# Altium PCB ArmBand-Sensor-Board.PcbDoc
Units mil, origin at the board's own origin, x right, y up, seen from the top; angles counter-clockwise.
Board outline 1181.1 x 984.25 mil, 2 copper layers (Top Layer, Bottom Layer), stack 34 mil thick; 36 components, 29 nets, 139 pads, 82 vias.
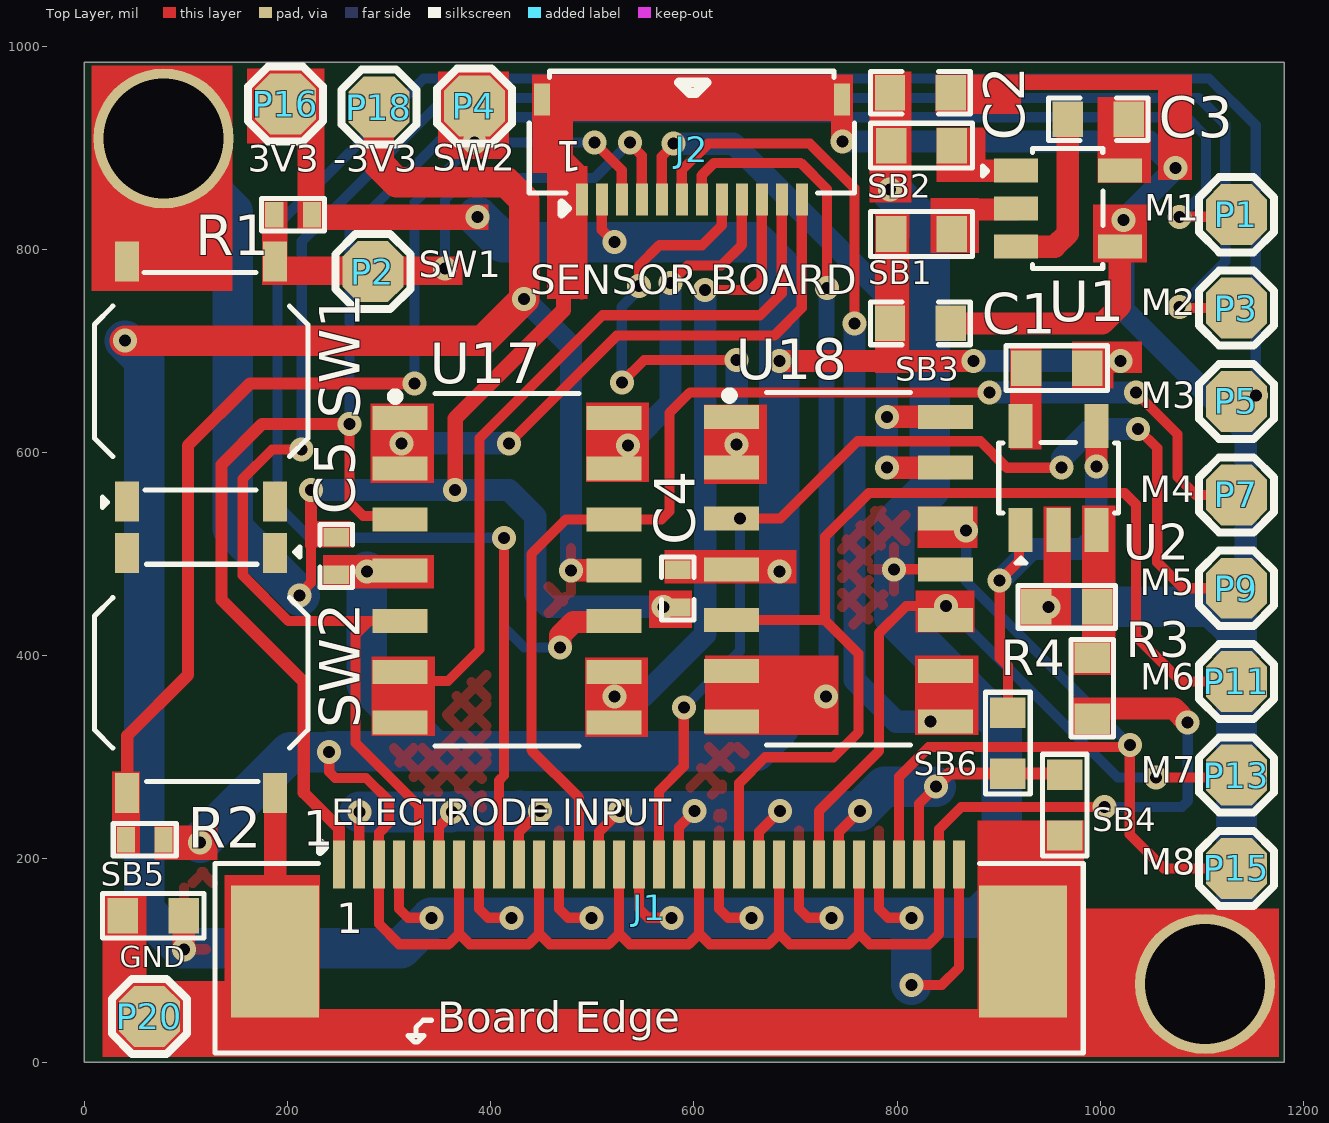
[diagram p0: Top Layer view]
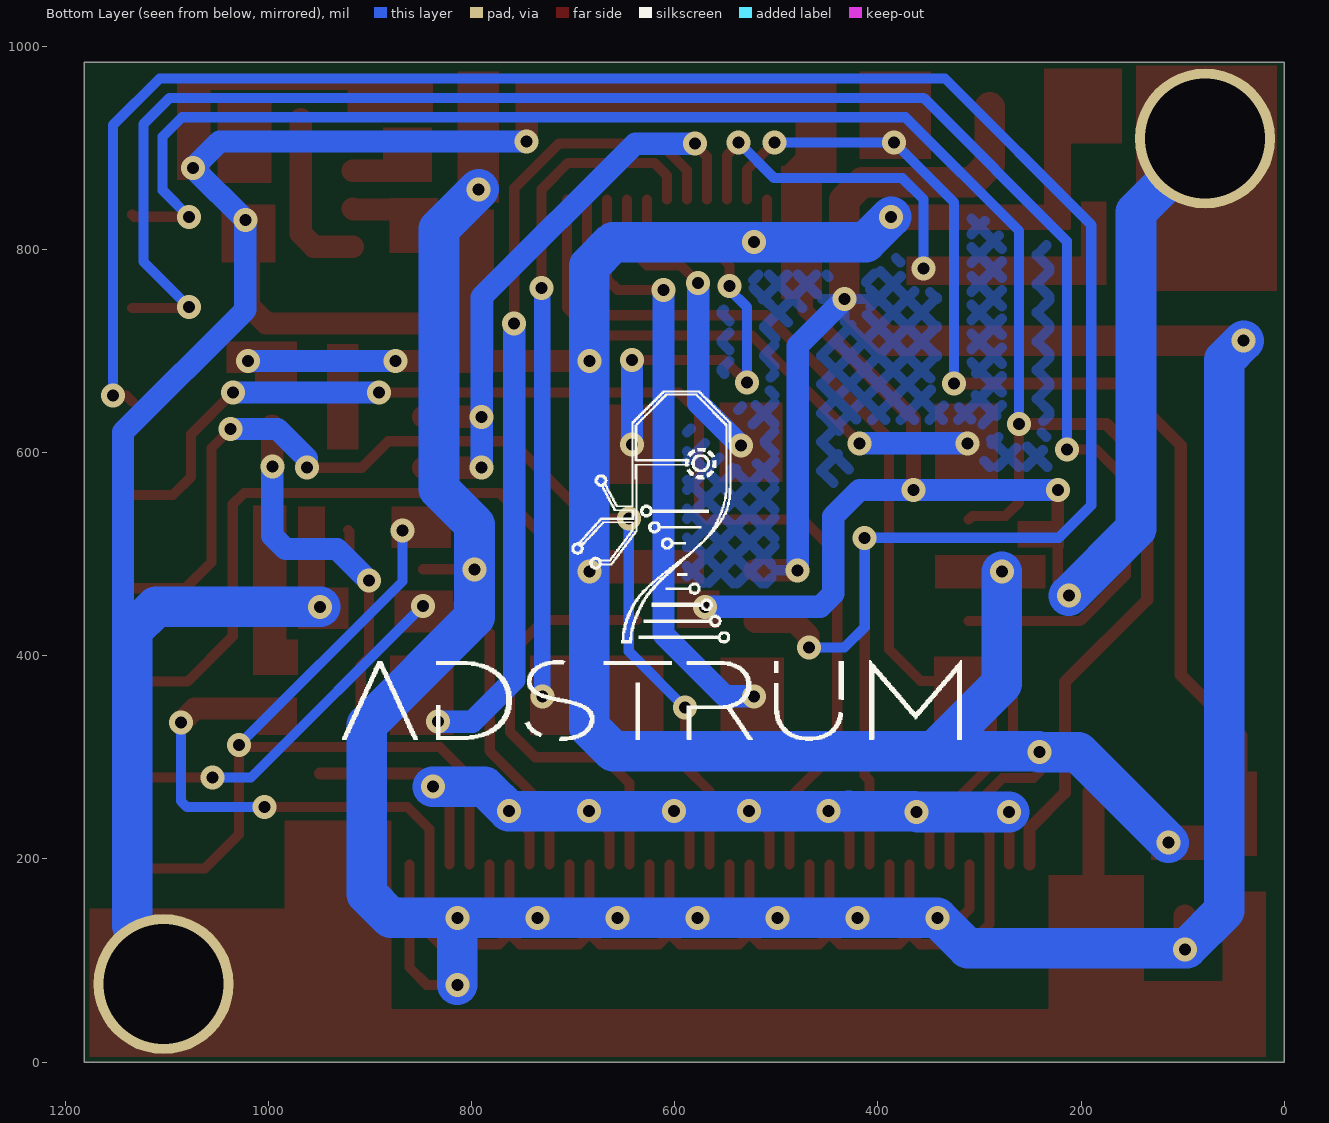
[diagram p1: Bottom Layer view, seen from below]
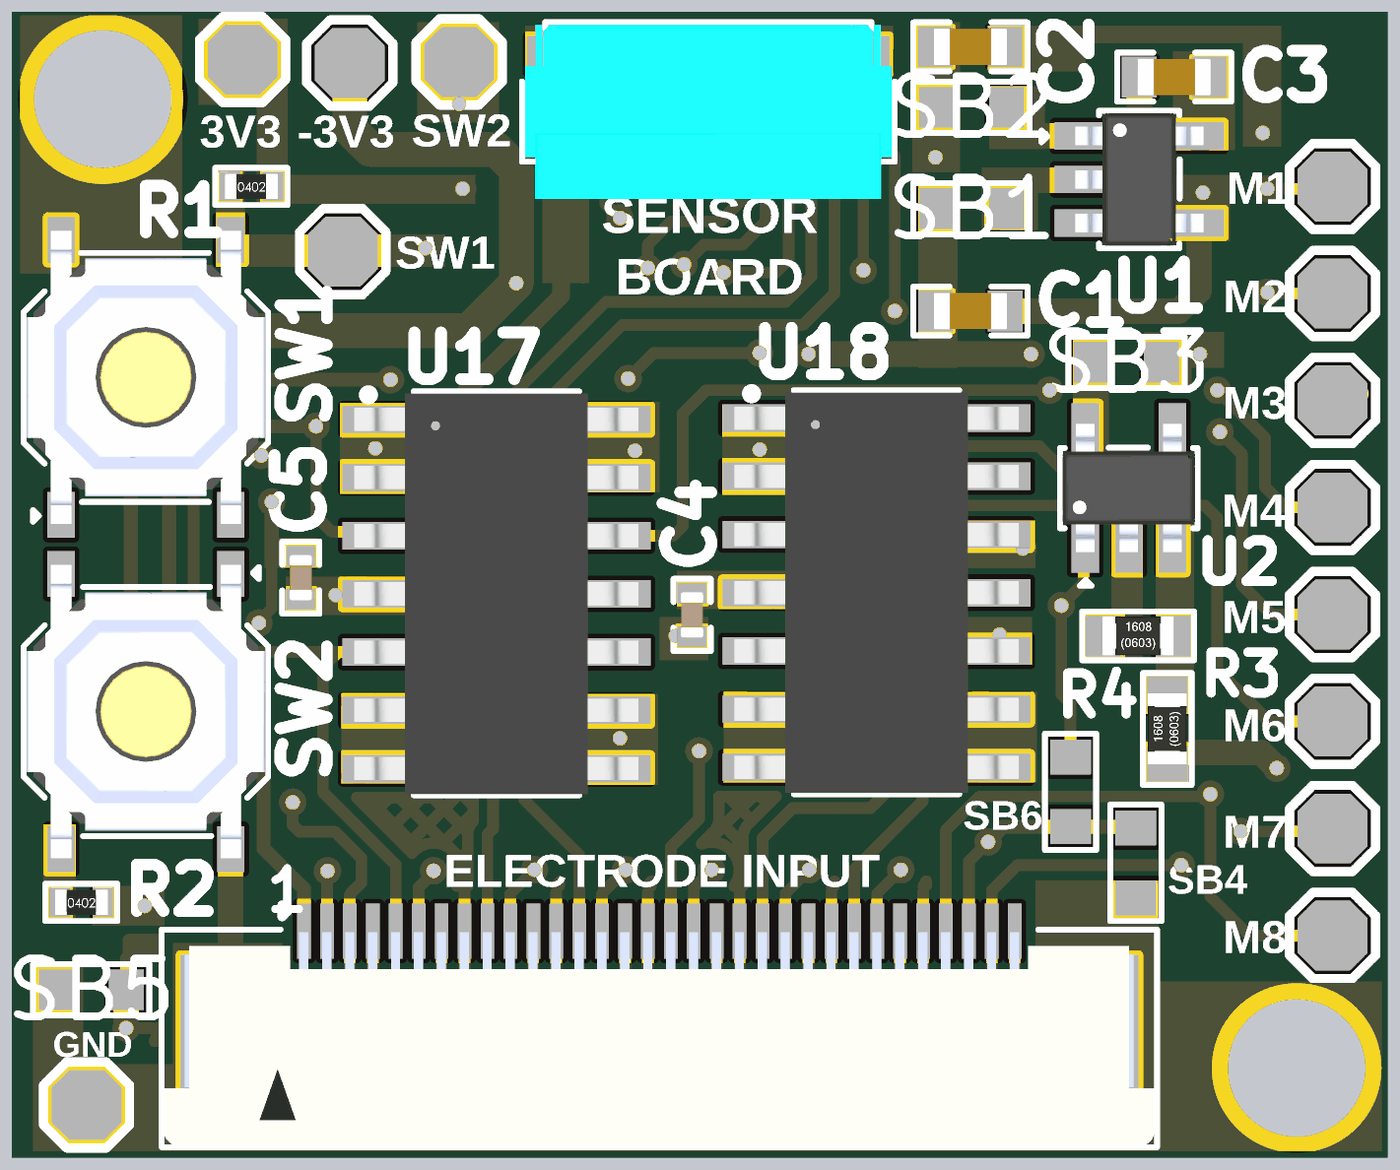
[diagram p2: 3D render of the assembled board from above, using the file's embedded part models]

## Layer stack, top to bottom
Top Solder: solder mask 3, Solder Resist, Dk 3.5
Top Layer: signal copper 9
Dielectric 1: dielectric 16, FR-4, Dk 4.8
Bottom Layer: signal copper 9
Bottom Solder: solder mask 3, Solder Resist, Dk 3.5

## Board outline
0,-0.25 1181.1,-0.25 1181.1,984 0,984

## Design rules (kind name [scope] priority, off if disabled: settings)
Clearance [All] p1: gap=7 ignorepadtopadclearanceinfootprint=FALSE except(0: Arc-Hole Track-Hole SMDPad-Hole THPad-Hole Via-Hole Fill-Hole Poly-Hole Region-Hole Text-Hole; 4: Arc-SMDPad Track-SMDPad SMDPad-SMDPad)
HoleSize [All] p1: absolutevalues=TRUE maxlimit=1000 minlimit=1 maxpercent=80.000 minpercent=20.000
HoleToHoleClearance [All] p1: gap=0 allowstackedmicrovias=TRUE
MinimumSolderMaskSliver [All] p1: minsoldermaskwidth=0
PolygonConnect [All] p1: connectstyle=Relief reliefconductorwidth=10 reliefentries=4 polygonreliefangle="90 Angle" airgapwidth=10
RoutingVias [All] p1: holewidth=11.81 width=23.62 viastyle="Through Hole" minholewidth=11.81 minwidth=23.62 maxholewidth=11.81 maxwidth=23.62
SilkToSilkClearance [All] p1: silktosilkclearance=0
SilkToSolderMaskClearance [IsPad] p1: minsilkscreentomaskgap=0 clearancetoexposedcopper=TRUE
SolderMaskExpansion [All] p1: expansion=4 istentingtop=FALSE
Width [All] p1: maxlimit=40 minlimit=10 preferedwidth=22
25 further rules are at their usual default settings.

## Classes and differential pairs
component class U_Opamp-Sheet2: C1 C2 C3 C4 C5 R3 R4 SB1 SB2 SB3 U1 U2 U17 U18
component class U_Connector-Sheet: J1 J2 P1 P2 P3 P4 P5 P7 P9 P11 P13 P15 P16 P18 P20 R1 R2 SB4 SB5 SB6 SW1 SW2

## Components (designator, comment, footprint, x,y, rotation, side; value= is the part's Value field where it differs from the comment)
C1 "10uF" Cap-0603 823,727 r0 top locked
C2 "10uF" Cap-0603 823,954 r0 top locked
C3 "10uF" Cap-0603 998,928 r180 top
C4 "0.1uF" Cap-0402 584,466 r270 top locked
C5 "0.1uF" Cap-0402 248,498 r90 top locked
J1 "AFC07-S32FCA-00" AFC07-S32FCA-00_ 555.89,151.72 r0 top locked
J2 "FH34SRJ-12S-0.5SH(50)" FH34SRJ-12S-0.5SH(50)_ 597.9,898.21 r180 top locked
P1 "Test Point" "TEST POINT" 1134,834 r0 top locked
P2 "TEST POINT" Test-point 284,778 r0 top locked
P3 "Test Point" "TEST POINT" 1134,742.09 r0 top locked
P4 "TEST POINT" Test-point 384,941 r0 top locked
P5 "Test Point" "TEST POINT" 1134,650.17 r0 top locked
P7 "Test Point" "TEST POINT" 1134,558.26 r0 top locked
P9 "Test Point" "TEST POINT" 1134,466.34 r0 top locked
P11 "Test Point" "TEST POINT" 1134,374.43 r0 top locked
P13 "Test Point" "TEST POINT" 1134,282.51 r0 top locked
P15 "Test Point" "TEST POINT" 1134,190.6 r0 top locked
P16 "Test Point" "TEST POINT" 198,943 r90 top locked
P18 "Test Point" "TEST POINT" 290,940 r180 top locked
P20 "Test Point" "TEST POINT" 64,45 r0 top locked
R1 "10K" Res-0402 205.5,834 r0 top locked
R2 "10K" Res-0402 59.5,219 r0 top locked
R3 "64K" Res-0603 992,368 r270 top
R4 "64K" Res-0603 967,448 r180 top
SB1 "Solder Bridge" "Solder Bridge" 824,815 r0 top locked
SB2 "Solder Bridge" "Solder Bridge" 824,902 r180 top locked
SB3 "Solder Bridge" "Solder Bridge" 957,683 r180 top
SB4 "Solder Bridge" "Solder Bridge" 965,253 r270 top locked
SB5 "Solder Bridge" "Solder Bridge" 68,144 r180 top locked
SB6 "Solder Bridge" "Solder Bridge" 909,314 r270 top
SW1 "TC-0522C-1.7-260G" TC-0522C-1.7-260G_ 115,670 r90 top locked value=-
SW2 "TC-0522C-1.7-260G" TC-0522C-1.7-260G_ 115,383 r270 top locked value=-
U1 "SGM3207YN5G/TR" SOT-23-5 968,840 r0 top locked
U2 "TPMCP6021T-E/OT" SOT-23-5 959,575 r90 top
U17 "LM324DT" SO-14 416,484 r0 top locked
U18 "LM324DT" SO-14 742.31,485 r0 top locked

## Footprints (in the part's own frame and the unit in brackets; to place one, negate y for a bottom-side part, rotate by r counter-clockwise, add the part's x,y. Pads: shape width x height; smd on the part's side, far side on the other; paste and mask are expansions set on the pad)
AFC07-S32FCA-00_ [mm]
  rect 0.3x1.2 smd: 1(-7.75,1.085) 2(-7.25,1.085) 3(-6.75,1.085) 4(-6.25,1.085) 5(-5.75,1.085) 6(-5.25,1.085) 7(-4.75,1.085) 8(-4.25,1.085) 9(-3.75,1.085) 10(-3.25,1.085) 11(-2.75,1.085) 12(-2.25,1.085) 13(-1.75,1.085) 14(-1.25,1.085) 15(-0.75,1.085) 16(-0.25,1.085) 17(0.25,1.085) 18(0.75,1.085) 19(1.25,1.085) 20(1.75,1.085) 21(2.25,1.085) 22(2.75,1.085) 23(3.25,1.085) 24(3.75,1.085) 25(4.25,1.085) 26(4.75,1.085) 27(5.25,1.085) 28(5.75,1.085) 29(6.25,1.085) 30(6.75,1.085) 31(7.25,1.085) 32(7.75,1.085)
  rect 2.2x3.3 smd: MP1(9.35,-1.085) MP2(-9.35,-1.085)
  silkscreen extent -10.85,-3.63 10.85,1.65, body extent -10.8,-3.59 10.79,1.05, height 2.02
Cap-0402 [mil]
  rect 18x25 smd mask+2.36: 1(-18.5,0) 2(18.5,0)
  silkscreen extent -31,-16 31,16, body extent -20,-10 20,10, height 19
Cap-0603 [mil]
  rect 30x35 smd mask+2.36: 1(-30,0) 2(30,0)
  silkscreen extent -49,-21 49,21, body extent -32,-16 31,16, height 34
FH34SRJ-12S-0.5SH(50)_ [mm]
  rect 0.3x0.8 smd: 1(2.75,1.25) 2(2.25,1.25) 3(1.75,1.25) 4(1.25,1.25) 5(0.75,1.25) 6(0.25,1.25) 7(-0.25,1.25) 8(-0.75,1.25) 9(-1.25,1.25) 10(-1.75,1.25) 11(-2.25,1.25) 12(-2.75,1.25)
  rect 0.4x0.8 smd: MP1(-3.75,-1.25) MP2(3.75,-1.25)
  silkscreen extent -4.06,-1.96 4.06,1.63, body extent -4,-1.9 4,1.9, height 1
Res-0402 [mil]
  rect 18x25 smd mask+2.17: 1(-18.5,0) 2(18.5,0)
  silkscreen extent -32,-17 32,16, body extent -23,-11 23,11, height 16
Res-0603 [mil]
  rect 30x35 smd: 1(-30,0) 2(30,0)
  silkscreen extent -48,-21 48,21, body extent -31,-17 31,17, height 18
SO-14 [mm] "0.4 V/us 4 1.3MHz 3V ~ 32V, ±1.5V ~ 16V 1.5mA General Purpose SOIC-14_150mil Operational Amplifier ROHS"
  rect 1.37x0.6 smd: 1(-2.675,3.81) 2(-2.675,2.54) 3(-2.675,1.27) 4(-2.675,0) 5(-2.675,-1.27) 6(-2.675,-2.54) 7(-2.675,-3.81) 8(2.675,-3.81) 9(2.675,-2.54) 10(2.675,-1.27) 11(2.675,0) 12(2.675,1.27) 13(2.675,2.54) 14(2.675,3.81)
  silkscreen extent -2.87,-4.39 1.8,4.42, body extent -3.1,-4.37 3.1,4.37, height 1.76
"Solder Bridge" [mil] "Solder Bridge ON"
  rect 30x35 smd: 1(-30,0) 2(30,0)
  silkscreen extent -50,-22 50,22
SOT-23-5 [mm]
  rect 1.1x0.6 smd: 1(-1.3,0.95) 2(-1.3,0) 3(-1.3,-0.95) 4(1.3,-0.95) 5(1.3,0.95)
  silkscreen extent -2.13,-1.5 0.88,1.5, body extent -1.4,-1.45 1.4,1.45, height 1.45
TC-0522C-1.7-260G_ [mm]
  rect 1x0.6 smd: 1(-3,1.85) 2(3,1.85) 3(3,-1.85) 4(-3,-1.85)
  silkscreen extent -3.15,-2.67 2.72,2.67, body extent -3.2,-2.6 3.2,2.6, height 1.7
"TEST POINT" [mil]
  oct 60x60 smd: 1(0,0)
  silkscreen extent -37,-37 37,37
Test-point [mil]
  oct 60x60 smd: 1(0,0)
  silkscreen extent -37,-37 37,37

## Part data
C1 C2 C3: library part CL10A106MA8NRNC, "CAP CER 10UF 25V X5R 0603", Case Code (Imperial)=0603, Case Code (Metric)=1608, Dielectric=X5R, LCSC Part Number=C96446, Manufacturer=Samsung, Max Operating Temperature=85°C, Min Operating Temperature=-55°C, Package Quantity=1, Tolerance=20%, Voltage Rating=25V, Capacitance=10uF, Case/Package=0603, Category="Ceramic Capacitors", ComponentLink1Description=https://datasheet.ciiva.com/25766/cl10a106ma8nrnc-25766562.pdf?src-supplier=Digi-Key, ComponentLink1URL=https://datasheet.ciiva.com/25766/cl10a106ma8nrnc-25766562.pdf?src-supplier=Digi-Key, Construction=Flat, Contact Plating=Tin, Lead Free="Lead Free", Length=0.063inch, Manufacturer Part Number=CL10A106MA8NRNC, Mount="Surface Mount", Packaging="Tape and Reel", Pricing 1="4000=0.03753, 8000=0.03700, 16000=0.03595, 24000=0.03515, 32000=0.03383, 40000=0.03304, 400000=0.03225 (USD)", RoHS=Yes, RoHS Compliant=Yes, Series=CL, Supplier 1=Avnet, Supplier Part Number 1=CL10A106MA8NRNC, Termination=Wraparound, Thickness=0.035inch, Width=0.031inch
C4 C5: library part GRM155R71H104ME14D, "CAP CER 0.1UF 50V X7R 0402", Capacitance=100nF, Case/Package=0402, LCSC Part Number=C182412, Manufacturer=Murata, Max Operating Temperature=125°C, Min Operating Temperature=-55°C, Tolerance=20%, Voltage Rating=50V, Category="Ceramic Capacitors", ComponentLink1Description=http://www.mouser.com/ds/2/281/c02e-2905.pdf?src-supplier=Mouser, ComponentLink1URL=http://www.mouser.com/ds/2/281/c02e-2905.pdf?src-supplier=Mouser, ComponentLink2Description=http://search.murata.co.jp/Ceramy/image/img/A01X/G101/ENG/GRM155R71H104ME14-01.pdf?src-supplier=Digi-Key, ComponentLink2URL=http://search.murata.co.jp/Ceramy/image/img/A01X/G101/ENG/GRM155R71H104ME14-01.pdf?src-supplier=Digi-Key, ComponentLink3Description=http://psearch.en.murata.com/capacitor/product/GRM155R71H104ME14%23.pdf?src-supplier=Avnet, ComponentLink3URL=http://psearch.en.murata.com/capacitor/product/GRM155R71H104ME14%23.pdf?src-supplier=Avnet, Item Type=Capacitor, Length=0.039inch, Manufacturer Part Number=GRM155R71H104ME14D, Mount="Surface Mount", Packaging="Cut Tape", Pricing 1="10000=0.00444, 20000=0.00420, 40000=0.00396, 60000=0.00372, 80000=0.00348, 100000=0.00324, 1000000=0.00300 (USD)", RoHS=Yes, RoHS Compliant=Yes, Stock 1=100000, Supplier 1=Avnet, Supplier Part Number 1=GRM155R71H104ME14D, Thickness=0.022inch, Width=0.02inch
J1: "Slide Lock 32 Bottom Contact Surface Mount 0.5mm SMD,P=0.5mm FFC/FPC Connectors ROHS", LCSC Part Number=C262570, Manufacturer=JUSHUO, ComponentLink1Description=LCSC, ComponentLink1URL=https://lcsc.com/product-detail/FFC-FPC-Connectors_JUSHUO-AFC07-S32FCA-00_C262570.html, Item Type="FPC Connector", Manufacturer Part Number=AFC07-S32FCA-00
J2: "CONN FPC/FFC 12POS .5MM", LCSC Part Number=C424659, Manufacturer=Hirose, Supplier Part Number 1=FH34SRJ-12S-0.5SH(50)-ND, Category="FFC / FPC", ComponentLink1Description=https://www.hirose.com/product/en/download_file/key_name/FH34SRJ/category/Catalog/doc_file_id/31646/?file_category_id=4&item_id=27&is_series=1&src-supplier=Digi-Key, ComponentLink1URL=https://www.hirose.com/product/en/download_file/key_name/FH34SRJ/category/Catalog/doc_file_id/31646/?file_category_id=4&item_id=27&is_series=1&src-supplier=Digi-Key, Item Type="FFC Connector", Manufacturer Part Number=FH34SRJ-12S-0.5SH(50), Pricing 1="5000=0.47775 (USD)", RoHS=Yes, Supplier 1=Digi-Key
P1 P3 P5 P7 P9 P11 P13 P15 P16 P18 P20: library part "TEST POINT", "Test Point ON"
P2 P4: "Test Point ON", Item Type="TEST POINT"
R1 R2: library part RC0402FR-0710KL, "RES 10K OHM 1% 1/16W 0402", Case Code (Imperial)=0402, Case Code (Metric)=1005, LCSC Part Number=C60490, Manufacturer=Yageo, Max Operating Temperature=155°C, Max Power Dissipation=63mW, Min Operating Temperature=-55°C, Power Rating=62.5mW, Resistance=10kR, Resistance Tolerance=1%, Resistor Type="Thick Film", Supplier Part Number 1=603-RC0402FR-0710KL, Temperature Coefficient=100ppm/°C, Voltage Rating=50V, Case/Package=0402, Category="Chip SMD Resistors", ComponentLink1Description=https://datasheet.ciiva.com/7660/38568-7660787.pdf?src-supplier=Element14, ComponentLink1URL=https://datasheet.ciiva.com/7660/38568-7660787.pdf?src-supplier=Element14, ComponentLink2Description=https://datasheet.ciiva.com/7849/1686128-7849814.pdf?src-supplier=Element14, ComponentLink2URL=https://datasheet.ciiva.com/7849/1686128-7849814.pdf?src-supplier=Element14, ComponentLink3Description=https://datasheet.ciiva.com/7983/1018594-7983486.pdf?src-supplier=Element14, ComponentLink3URL=https://datasheet.ciiva.com/7983/1018594-7983486.pdf?src-supplier=Element14, ComponentLink4Description=https://datasheet.ciiva.com/22747/1018594-22747512.pdf?src-supplier=Element14, ComponentLink4URL=https://datasheet.ciiva.com/22747/1018594-22747512.pdf?src-supplier=Element14, ComponentLink5Description=https://datasheet.ciiva.com/12667/pyu-rc0402-51-rohs-l-6-r-12667067.pdf?src-supplier=Mouser, ComponentLink5URL=https://datasheet.ciiva.com/12667/pyu-rc0402-51-rohs-l-6-r-12667067.pdf?src-supplier=Mouser, ComponentLink6Description=https://datasheet.ciiva.com/7849/1784430-7849813.pdf?src-supplier=Element14, ComponentLink6URL=https://datasheet.ciiva.com/7849/1784430-7849813.pdf?src-supplier=Element14, ComponentLink7Description=https://datasheet.ciiva.com/7849/1784430-7849815.pdf?src-supplier=Element14, ComponentLink7URL=https://datasheet.ciiva.com/7849/1784430-7849815.pdf?src-supplier=Element14, Construction=Rectangular, Depth=0.5mm, Features="Moisture Resistant", Height=0.32mm, Lead Free="Lead Free", Lead Pitch=0.2mm, Length=1mm, Manufacturer Part Number=RC0402FR-0710KL, Military Standard=Not, Number of Pins=2, Number of Terminations=2, Packaging="Tape and Reel", Pricing 1="1=0.10000, 10=0.01400, 50=0.01400, 100=0.00500, 1000=0.00300, 10000=0.00200 (USD)", REACH SVHC="No SVHC", RoHS=Yes, RoHS Compliant=Yes, Series=RC, Stock 1=18648329, Supplier 1=Mouser, Termination=SMD/SMT, Tolerance=1%, Voltage Rating (DC)=50V, Width=0.5mm, Working Voltage=50V
R3 R4: library part ARG03DTC6402N, "1/10W Thin Film Resistor 75V ±0.5% ±25ppm/℃ -55℃~+155℃ 64kΩ 0603 Chip Resistor - Surface Mount ROHS", LCSC Part Number=C2902643, Manufacturer="iking Tech", ComponentLink1Description=LCSC, ComponentLink1URL=https://lcsc.com/product-detail/Chip-Resistor-Surface-Mount_Viking-Tech-ARG03DTC6402N_C2902643.html, Item Type=Resistor, Manufacturer Part Number=ARG03DTC6402N
SB1 SB2 SB3 SB4 SB5 SB6: "Solder Bridge ON"
SW1 SW2: "No Gull Wing 50mA 100MΩ 80000 260gf@±50gf 12V -25℃~+85℃ 1.7mm Golden Round Button Brick nogging SPST SMD Tactile Switches ROHS", LCSC Part Number=C2845290, Manufacturer=HCTL, ComponentLink1Description=LCSC, ComponentLink1URL=https://www.lcsc.com/product-detail/Tactile-Switches_HCTL-TC-0522C-1-7-260G_C2845290.html, Item Type=Switch, Manufacturer Part Number=TC-0522C-1.7-260G
U1: "NO Charge pump 1 -5.5V~-1.4V 1.4V~5.5V 60mA 19kHz SOT-23-5 DC-DC Converters ROHS", LCSC Part Number=C80403, Manufacturer="SG Micro", Category=Uncategorized, Item Type=IC, Manufacturer Part Number=SGM3207YN5G/TR, Pricing 1="3000=0.38750, 6000=0.36250, 12000=0.33750, 18000=0.32500, 24000=0.31250, 30000=0.31250, 300000=0.30500 (USD)", RoHS=No, Supplier 1=Avnet, Supplier Part Number 1=SGM3207YN5G/TR
U2: "SOT-23-5 Operational Amplifier ROHS", LCSC Part Number=C2923365, Manufacturer="TECH PUBLIC", ComponentLink1Description=LCSC, ComponentLink1URL=https://www.lcsc.com/product-detail/Operational-Amplifier_TECH-PUBLIC-TPMCP6021T-E-OT_C2923365.html, Item Type=IC, Manufacturer Part Number=TPMCP6021T-E/OT
U17 U18: "IC OPAMP GP 1.3MHZ 14SO", Case/Package=SO, Dual Supply Voltage=12V, Input Bias Current=150nA, Input Offset Voltage (Vos)=7mV, Input Voltage Noise Density="40nV/sqrt Hz", Manufacturer=STMicroelectronics, Max Dual Supply Voltage=15V, Max Operating Temperature=70°C, Max Power Dissipation=400mW, Max Supply Voltage=30V, Min Dual Supply Voltage=1.5V, Min Operating Temperature=0°C, Min Supply Voltage=3V, Nominal Supply Current=1.2mA, Output Current=40mA, Package Quantity=2500, Voltage Gain=100dB, Bandwidth=1.3MHz, Category="Amplifiers - Op Amps, Buffer, Instrumentation", Common Mode Rejection Ratio=70dB, ComponentLink1Description=https://datasheet.ciiva.com/4758/cd00000457-103203-4758032.pdf?src-supplier=Mouser, ComponentLink1URL=https://datasheet.ciiva.com/4758/cd00000457-103203-4758032.pdf?src-supplier=Mouser, ComponentLink2Description=https://datasheet.ciiva.com/8008/1834360-8008827.pdf?src-supplier=Element14, ComponentLink2URL=https://datasheet.ciiva.com/8008/1834360-8008827.pdf?src-supplier=Element14, ComponentLink3Description=https://datasheet.ciiva.com/8008/1834360-8008490.pdf?src-supplier=Element14, ComponentLink3URL=https://datasheet.ciiva.com/8008/1834360-8008490.pdf?src-supplier=Element14, ComponentLink4Description=https://datasheet.ciiva.com/28630/1834360-28630538.pdf?src-supplier=Element14, ComponentLink4URL=https://datasheet.ciiva.com/28630/1834360-28630538.pdf?src-supplier=Element14, ComponentLink5Description=https://datasheet.ciiva.com/1795/cd00000457-1795560.pdf?src-supplier=Digi-Key, ComponentLink5URL=https://datasheet.ciiva.com/1795/cd00000457-1795560.pdf?src-supplier=Digi-Key, ComponentLink6Description=https://datasheet.ciiva.com/1795/cd00000457-1795559.pdf?src-supplier=Digi-Key, ComponentLink6URL=https://datasheet.ciiva.com/1795/cd00000457-1795559.pdf?src-supplier=Digi-Key, ComponentLink7Description=https://datasheet.ciiva.com/1795/cd00000457-1795561.pdf?src-supplier=Digi-Key, ComponentLink7URL=https://datasheet.ciiva.com/1795/cd00000457-1795561.pdf?src-supplier=Digi-Key, ComponentLink8Description=https://datasheet.ciiva.com/16375/cd00000457-16375528.pdf?src-supplier=Future+Electronics, ComponentLink8URL=https://datasheet.ciiva.com/16375/cd00000457-16375528.pdf?src-supplier=Future+Electronics, Contact Plating=Tin,Matte, Gain Bandwidth Product=1.3MHz, Height=1.65mm, Lead Free="Lead Free", Length=8.75mm, Manufacturer Part Number=LM324DT, Mount="Surface Mount", Number of Amplifiers=4, Number of Channels=4, Number of Circuits=4, Number of Elements=4, Number of Pins=14, Operating Supply Current=1.2mA, Operating Supply Voltage=15V, Output Current per Channel=40mA, Packaging="Cut Tape", Pricing 1="2500=0.18900 (USD)", Radiation Hardening=No, REACH SVHC="No SVHC", RoHS=Yes, RoHS Compliant=Yes, Series=LM324, Slew Rate=0.4V/µs, Stock 1=287500, Supplier 1="Arrow Electronics", Supplier Part Number 1=LM324DT, Supply Type=Single,Dual, Technology=BIPOLAR, Unity Gain Bandwidth Product=1.3MHz, Weight=0.009143oz, Width=4mm

## Free pads (board coordinates)
  round 137.8 hole 118.11: MH1(78,909) MH2(1103.1,76.75)

## Via types
v1: diameter 23.62, hole 11.81, Top Layer to Bottom Layer, tented both sides, 82 vias

## Nets (pads, with @x,y where several pads share a name; then routed paths per layer and width w, separated by ;. In a path a pad name is that pad's centre, name@x,y a point inside that pad or via, vN(x,y) a via of type N, cw(c..) or ccw(c..) an arc to the next point about the centre after c; other vN are vias at no path point)
-VCC_3V3: C2.1 J1.4 J1.8 J1.12 J1.16 J1.20 J1.24 J1.28 J1.32 P18.1 SB2.2 SB5.1 U17.11 U18.11 | length 4123.7
  Top Layer w10: J1.4 309.83,150.73 318.56,142 v1(341.56,142) ; J1.8 388.57,150.73 397.3,142 v1(420.3,142) ; J1.12 467.31,150.73 476.04,142 v1(499.04,142) ; J1.16 546.05,150.73 554.78,142 v1(577.78,142) ; J1.20 624.79,150.73 633.52,142 v1(656.52,142) ; J1.24 703.53,150.73 712.26,142 v1(735.26,142) ; J1.28 782.27,150.73 791,142 v1(814,142) ; v1(797,485) U18.11 ; v1(814,76) 844,76 861.01,93.01 J1.32
  Top Layer w22: v1(98,111) SB5.1 ; v1(479,484) U17.11
  Top Layer w30: v1(40,710) 392,710 v1(433,751) 433,848.43 415.43,866 307.57,866 290,883.57 P18.1
  Bottom Layer w22: v1(433,751) 479,705 v1(479,484)
  Bottom Layer w40: v1(40,710) 59,691 59,149 96,112 311.56,112 v1(341.56,142) v1(420.3,142) v1(499.04,142) v1(577.78,142) v1(656.52,142) v1(735.26,142) 879.57,142 903,165.43 903,332 797,438 v1(797,485) 797,529 832,564 832,820 v1(793,859) ; v1(814,76) v1@814,139
CAP+: C3.1 U1.5
CAP-: C3.2 U1.3 | length 169
  Top Layer w22: U1.3 955.11,802.6 968,815.49 C3.2
GND: C1.2 C2.2 C4.2 C5.2 J1.MP1 J1.MP2 J2.1 J2.MP1 J2.MP2 P20.1 pad.MH1 pad.MH2 R4.2 SB4.2 SB5.2 SW1.2 SW2.2 U1.4 U2.2 | length 3480
  Top Layer w10: v1(212,459) 212,460.67 223,471.67 223,522.36 228.48,516.87 ccw(c231.45,528.45) 231.4,516.5 C5.2 ; v1(223,563) v1@223,565 ; J2.MP2 450.25,916.75 489.63,877.37 J2.1 489.63,755.63
  Top Layer w12: 223,522.36 v1(223,563) ; 471.56,812.74 475.32,816.5
  Top Layer w15: v1(365,563) 365,633.47 471.56,740.03 471.56,812.74
  Top Layer w22: J1.MP2 187.83,109.05 SW2.2 ; J2.MP1 745.77,947.2 745.77,906.23 v1(746,906) ; C1.2 1002,727 1019.18,744.18 U1.4 ; 1073.5,920 1074,919.5 v1(1074,880)
  Bottom Layer w22: v1(223,563) v1(365,563) 418,563 444,537 444,460.89 456.89,448 v1(570,448) ; v1(746,906) 1048,906 v1(1074,880) v1(1022.67,828.67) 1022.67,740.33 1143,620 1143,424.57
  Bottom Layer w40: pad.MH1 78,904.67 146,836.67 146,525 v1(212,459) ; v1(949,448) 1110.57,448 1134,424.57 1134,134.11 1103.1,103.21 pad.MH2
Measure1: J1.1 P1.1 U17.3 | length 1951.7
  Top Layer w10: v1(261,628) 261,551 274.57,537.43 307.26,537.43 U17.3 ; v1(1078,832) 1132,832 P1.1
  Top Layer w12: J1.1 250.77,230.23 216,265 216,374 135,455 135,588 175,628 v1(261,628)
  Bottom Layer w10: v1(261,628) 261,818 373,930 1085,930 1104,911 1104,858 v1(1078,832)
Measure2: J1.5 P3.1 U17.5 | length 2047.7
  Top Layer w10: v1(214,603) 185,603 156,574 156,479 201,434 280,434 ; U17.5@311,434 U17.5 280,434 ; J1.5 329.51,251.49 267,314 267,421 280,434 ; v1(1078,743) 1078.91,742.09 P3.1
  Bottom Layer w10: v1(214,603) 214,808 355,949 1097,949 1123,923 1123,788 v1(1078,743)
Measure3: J1.9 P5.1 U17.10 | length 2387
  Top Layer w10: J1.9 408.25,277.25 413,282 v1(413,516) ; P5.1 1139.83,656 v1(1153,656)
  Top Layer w22: v1(468,408) 468.31,408.31 468.31,419.8 481.7,433.19 520.5,433.19 U17.10
  Bottom Layer w10: v1(468,408) 433,408 413,428 v1(413,516) 222,516 190,548 190,824 334,968 1107,968 1153,922 v1(1153,656)
Measure4: J1.13 P7.1 U17.12 | length 1208
  Top Layer w10: J1.13 486.99,260.01 440,307 440,500 474,534 U17.12 568,534 576,542 576,639 596,659 v1(891,659) ; v1(1035,659) 1076,618 1076,576 1093.74,558.26 P7.1
  Bottom Layer w22: v1(891,659) v1(1035,659)
Measure5: J1.17 P9.1 U18.3 | length 1056.5
  Top Layer w10: J1.17 565.73,266.73 590,291 v1(590,349) ; v1(645.19,535) 685,535 761,611 882,611 908,585 v1(962,585) ; v1(1037.16,623.16) 1056,604.33 1056,492 1081.66,466.34 P9.1
  Bottom Layer w10: v1(590,349) 645.19,404.19 v1(645.19,535)
  Bottom Layer w22: v1(962,585) 962.31,585.31 962.31,594.47 991,623.16 v1(1037.16,623.16)
Measure6: J1.21 P11.1 U18.5 | length 1092.2
  Top Layer w10: U18.5 729,435 ; J1.21 644.47,274.47 670,300 737.29,300 762,324.71 762,402 729,435 ; P11.1 1079.57,374.43 1035,419 1035,549 1024,560 772,560 729,517 729,435
Measure7: J1.25 P13.1 U18.10 | length 700.3
  Top Layer w10: J1.25 723.21,247.21 782,306 782,422 808.86,448.86 847.86,448.86 v1(848,449) 848,435.37 U18.10 ; v1(1055,280) 1131.49,280 P13.1
  Bottom Layer w10: v1(848,449) 1017,280 v1(1055,280)
Measure8: J1.29 P15.1 U18.12 | length 834.1
  Top Layer w10: J1.29 801.95,280.95 831,310 v1@1027,310 ; U18.12 854.19,535 866.19,523 v1@867,523 ; v1(1029,312) v1@1027,310 ; P15.1 1062.4,190.6 1029,224 1029,308 v1@1027,310
  Bottom Layer w10: v1(868,523) 868,473 v1(1029,312)
NetSB1_2: SB1.2 U1.2 | length 74.6
  Top Layer w22: SB1.2 854,817.5 875.69,839.19 916.01,839.19 U1.2
NetSB2_1: SB2.1 U1.1 | length 77
  Top Layer w22: SB2.1 854,899.5 SB2.1@858,895.5 ; U1.1 878.6,877.4 SB2.1@860.5,895.5 ; SB2.1@858,895.5 SB2.1@860.5,895.5 ; SB2.1@858,895.5 SB2.1@860.5,895.5
NetSB3_2: SB3.2 U2.5
SENSOR1: J2.12 U17.1 U17.2 | length 556.2
  Top Layer w10: v1(418,609) 524,715 679,715 706.17,742.17 J2.12
  Bottom Layer w22: v1(312,609) v1(418,609)
SENSOR2: J2.11 U17.6 U17.7 | length 782.5
  Top Layer w10: U17.6 319.69,375 358,375 389,406 389,614 510,735 665,735 686.48,756.48 J2.11 ; 313.84,360 331.84,378 U17.6@331.84,383.19
SENSOR3: J2.10 U17.8 U17.9 | length 610.7
  Top Layer w10: v1(611,760) 656,760 666.8,770.8 J2.10
  Top Layer w22: U17.9 U17.9@540.3,384
  Bottom Layer w22: v1(522,360) 550,360 611,421 v1(611,760)
SENSOR4: J2.9 U17.13 U17.14 | length 307.6
  Top Layer w10: v1(577,767) 594,784 627,784 647.11,804.11 J2.9
  Bottom Layer w22: v1(535,607) 535.44,607 577,648.56 v1@577,766.56
SENSOR5: J2.8 U18.1 U18.2 | length 451.5
  Top Layer w10: v1(529,669) 551,691 v1@643,691 ; v1(546,764) 546,784 566,804 608,804 627.43,823.43 J2.8
  Bottom Layer w10: v1(529,669) 529,743.31 546,760.31 v1(546,764)
  Bottom Layer w22: v1(642,608) v1(642,691)
SENSOR6: J2.7 U18.6 U18.7 | length 662.5
  Top Layer w10: J2.7 607.74,872.74 620,885 705,885 731,859 v1(731,762)
  Bottom Layer w16: v1(730,359.81) 730.5,360.31 730.5,761.5 v1(731,762)
SENSOR7: J2.6 U18.8 U18.9 | length 804
  Top Layer w10: J2.6 588.06,878.06 614,904 714,904 758,860 v1(758,727)
  Bottom Layer w22: v1(758,727) 758,376 799,335 v1(833,335)
SENSOR8: J2.5 U18.13 U18.14 | length 615.5
  Top Layer w10: J2.5 568.37,891.33 580,902.96 v1(580,904)
  Top Layer w22: v1(790,585) U18.13 ; v1(790,635) U18.14
  Bottom Layer w22: v1(580,904) 638.81,904 790,752.81 v1(790,635) v1(790,585)
SW1: J2.4 P2.1 R1.1 SW1.3 | length 334
  Top Layer w10: v1(537,905) 537,904.02 548.69,892.33 J2.4
  Bottom Layer w10: v1(355,781) 355,848.96 376.04,870 502,870 v1(537,905)
SW2: J2.3 P4.1 R2.1 SW2.3 | length 1100.8
  Top Layer w10: v1@384,902 P4.1 ; v1(502,905) 529,878 J2.3
  Top Layer w12: SW2.3 42.17,321.17 102,381 102,607 163,668 v1(325,668)
  Bottom Layer w10: v1(325,668) 325,846 v1(384,905) v1(502,905)
VCC_3V3: C1.1 C4.1 C5.1 J1.3 J1.7 J1.11 J1.15 J1.19 J1.23 J1.27 J1.31 J2.2 P16.1 R1.2 R2.2 R3.2 SB1.1 SB3.1 U17.4 U18.4 | length 3774.8
  Top Layer w10: v1(241,305) 241,285.52 246.86,279.67 277.27,279.67 300,256.94 300,235.72 290.14,225.86 J1.3 290.14,135.86 310,116 358.56,116 368.88,126.32 ; J1.7 368.88,126.32 ; 379.2,116 368.88,126.32 ; 380.3,116 437.3,116 447.62,126.32 ; J1.11 447.62,126.32 ; 457.94,116 447.62,126.32 ; 459.04,116 516.04,116 526.36,126.32 ; J2.2 509.32,819.15 521.47,807 v1(522,807) ; J1.15 526.36,126.32 ; 536.69,116 526.36,126.32 ; 537.78,116 594.78,116 605.1,126.32 ; J1.19 605.1,126.32 ; 615.43,116 605.1,126.32 ; 616.52,116 673.52,116 683.84,126.32 ; J1.23 683.84,126.32 ; 694.17,116 683.84,126.32 ; 695.26,116 752.26,116 762.58,126.32 ; J1.27 762.58,126.32 ; 772.91,116 762.58,126.32 ; 774,116 831,116 841.32,126.32 J1.31 841.32,229.32 863,251 v1(1004,251)
  Top Layer w22: v1(684,690) v1(875,690) ; SB3.1 987,685.5 991,689.5 993.5,689.5 SB3.1@993.69,689.69 ; R3.2@992,348 1072.37,348 v1(1086,334.37) ; v1@1019.69,689.69 v1(1020,690)
  Top Layer w40: P16.1 198,939.72 P16.1@209,928.72
  Bottom Layer w10: v1(1004,251) 1080.14,251 1086,256.86 v1(1086,334.37)
  Bottom Layer w22: v1(875,690) v1(1020,690)
  Bottom Layer w40: v1(114,216) 203,305 v1(241,305) 242.03,306.03 344.43,306.03 ; v1@278,482.55 278,372.47 344.43,306.03 ; v1(387,832) 412,807 v1(522,807) 660.57,807 684,783.57 v1(684,690) v1(684,483) 684,329.47 660.57,306.03 344.43,306.03
  other v1: 278,483
VREF: SB6.1 U2.1 U2.4 | length 413.2
  Top Layer w10: SB6.1 909,390 901,398 v1(901,474) 920.02,493.02 920.02,522.24 U2.1
  Top Layer w22: v1(996,586) 996.2,586.2 996.2,625.98 U2.4
  Bottom Layer w22: v1(901,474) 901.44,474 932.44,505 983,505 996,518 v1(996,586)
VREF_GND: J1.2 J1.6 J1.10 J1.14 J1.18 J1.22 J1.26 J1.30 SB4.1 SB6.2 | length 1185.1
  Top Layer w10: J1.2 270.66,194.64 270.66,245.85 v1(270.86,246.05) ; J1.6 349.2,232.2 v1@362,245 ; J1.10 427.94,226.4 v1(448.62,247.08) ; J1.14 506.68,226.68 v1(527,247) ; J1.18 585.42,231.68 v1(600.74,247) ; J1.22 664.16,226.68 v1(684.48,247) ; J1.26 742.9,226.68 v1(763.22,247) ; J1.30 821.64,254.49 v1(838.14,271)
  Top Layer w12: v1(838.14,271) 851.14,284 907,284 SB6.2@909,282 ; SB6.2 SB4.1@949,284
  Bottom Layer w40: v1@271,246.19 v1@360.81,246.19 ; v1@364,247 428.53,247 428.62,247.08 ; 428.62,247 v1(527,247) v1(600.74,247) v1(684.48,247) v1(763.22,247) 787.22,271 v1(838.14,271)
  other v1: 362,246.19
VS+1: R3.1 R4.1 U2.3
pads on no net: SW1.1 SW1.4 SW2.1 SW2.4

## Polygon pours and split planes (outlines as drawn)
-VCC_3V3 on Bottom Layer "-VCC_3V3_L02_P001" (hatched 45Degree grid 20 track 10, remove dead copper, pour order 1): 100,99.75 1081.1,99.75 1081.1,884.25 100,884.25
-VCC_3V3 on Top Layer "-VCC_3V3_L01_P000" (hatched 45Degree grid 20 track 10, remove dead copper, pour order 0): 100,99.75 1081.1,99.75 1081.1,884.25 100,884.25

## Other copper
Top Layer:
  rectangle net GND: 217,506.58 262.43,532.45
  rectangle net GND: 455.2,751 495.43,882
  rectangle net GND: 441,875 481,932
  rectangle net NetSB1_2: 832.75,796.5 880.75,850.5
  rectangle net NetSB2_1: 839,866 887,920
  rectangle net SW2: 348,889 418,975
  rectangle net VCC_3V3: 972,678 1041,709
  rectangle net VCC_3V3: 972,663 1013,707
  rectangle net VS+1: 971,381 1015,416
  rectangle net VS+1: 982,381 1015,548
  rectangle net GND: 154,5 922,52
  rectangle net GND: 879,5 1176,151
  rectangle net GND: 556,427 598,464
  rectangle net GND: 7,759 146,981
  rectangle net GND: 138,62 232,184
  rectangle net GND: 20,5 232,80
  rectangle net GND: 18,5 61,168
  rectangle net GND: 993,787 1046,844
  rectangle net GND: 838,933 922,972
  rectangle net GND: 1057,868 1090,972
  rectangle net GND: 838,957 1090,972
  rectangle net VCC_3V3: 778,678 812,839
  rectangle net CAP+: 997,865 1050,950
  rectangle net -VCC_3V3: 773,846 814,975
  rectangle net Measure8: 820,506 879,547
  rectangle net NetSB3_2: 911,603 942,707
  rectangle net VCC_3V3: 972,322 1010,359
  rectangle net GND: 879,5 984,238
  rectangle net Measure7: 818,423 876,464
  rectangle net GND: 921,426 945,467
  rectangle net GND: 944,426 971,547
  rectangle net GND: 440.77,926 756.77,972
  rectangle net VCC_3V3: 571,471 701,504
  rectangle net VCC_3V3: 235,466 344,499
  rectangle net VCC_3V3: 211,819 398,844
  rectangle net VCC_3V3: 210,820 236.5,978
  rectangle net VCC_3V3: 160,904 230,978
  rectangle net VCC_3V3: 69,199 131,233
  region net SENSOR7: 880,400 817.69,400 817.69,322 880,322
  region net SENSOR4: 556,649 493.69,649 493.69,571 556,571
  region net SENSOR6: 742.31,400 611,400 611,322 742.31,322
  region net SENSOR3: 555,398 492.69,398 492.69,320 555,320
  rectangle net SW1: 175,765 200,847
  rectangle net SW1: 175,765 372,793
  region net SENSOR5: 672,647 609.69,647 609.69,569 672,569
  region net SENSOR2: 345,399 282.69,399 282.69,321 345,321
  rectangle net SW2: 27,203 55,286
  region net SENSOR1: 344,648 281.69,648 281.69,570 344,570

## Silkscreen, mask and mechanical layers (free items; w line width, h text height)
Top Overlay:
  lines w10: 585.25,964.25 595.75,953.75 601.75,953.75 612.25,964.25 585.25,964.25
  text "SW2" at 343,868.53 h45
  text "3V3" at 161,867.53 h45
  text "-3V3" at 245,867.53 h45
  text "M1" at 1043,819 h45
  text "SW1" at 329,763.53 h45
  text "SENSOR BOARD" at 439,746 h50
  text "M2" at 1040.03,726 h45
  text "M3" at 1039.62,634.53 h45
  text "M4" at 1038.57,542 h45
  text "M5" at 1038.98,450.53 h45
  text "M6" at 1039.27,357.53 h45
  text "M7" at 1039.74,266 h45
  text "ELECTRODE INPUT" at 243,224 h45
  text "1" at 215,213 h35
  text "M8" at 1039.74,175.53 h45
  text "GND" at 35,86.41 h35
Bottom Overlay:
  drawing of 2568 lines, arcs and shapes, not listed
Board Outline:
  the board outline again, w10

## Dimensions
0,0 to 1181.1,-0.25 on Dimension
0,984.25 to 0,0 on Dimension

## Text inside footprints (layer, text, board x,y; h text height)
J1: Top Overlay "Board Edge" at 347.31,29.58 h30; Top Overlay "1" at 247.89,126.72 h30
J2: Top Overlay "1" at 489.9,906.21 h30 r180